# Altium PCB 4GModule-MiniPCI-E_PCB.PcbDoc
Units mil, origin at the board's own origin, x right, y up, seen from the top; angles counter-clockwise.
Board outline not stored, 4 copper layers (Top Layer, Internal Plane 1, Mid-Layer 1, Bottom Layer), stack 18.2 mil thick; 25 components, 0 nets, 124 pads, 0 vias.
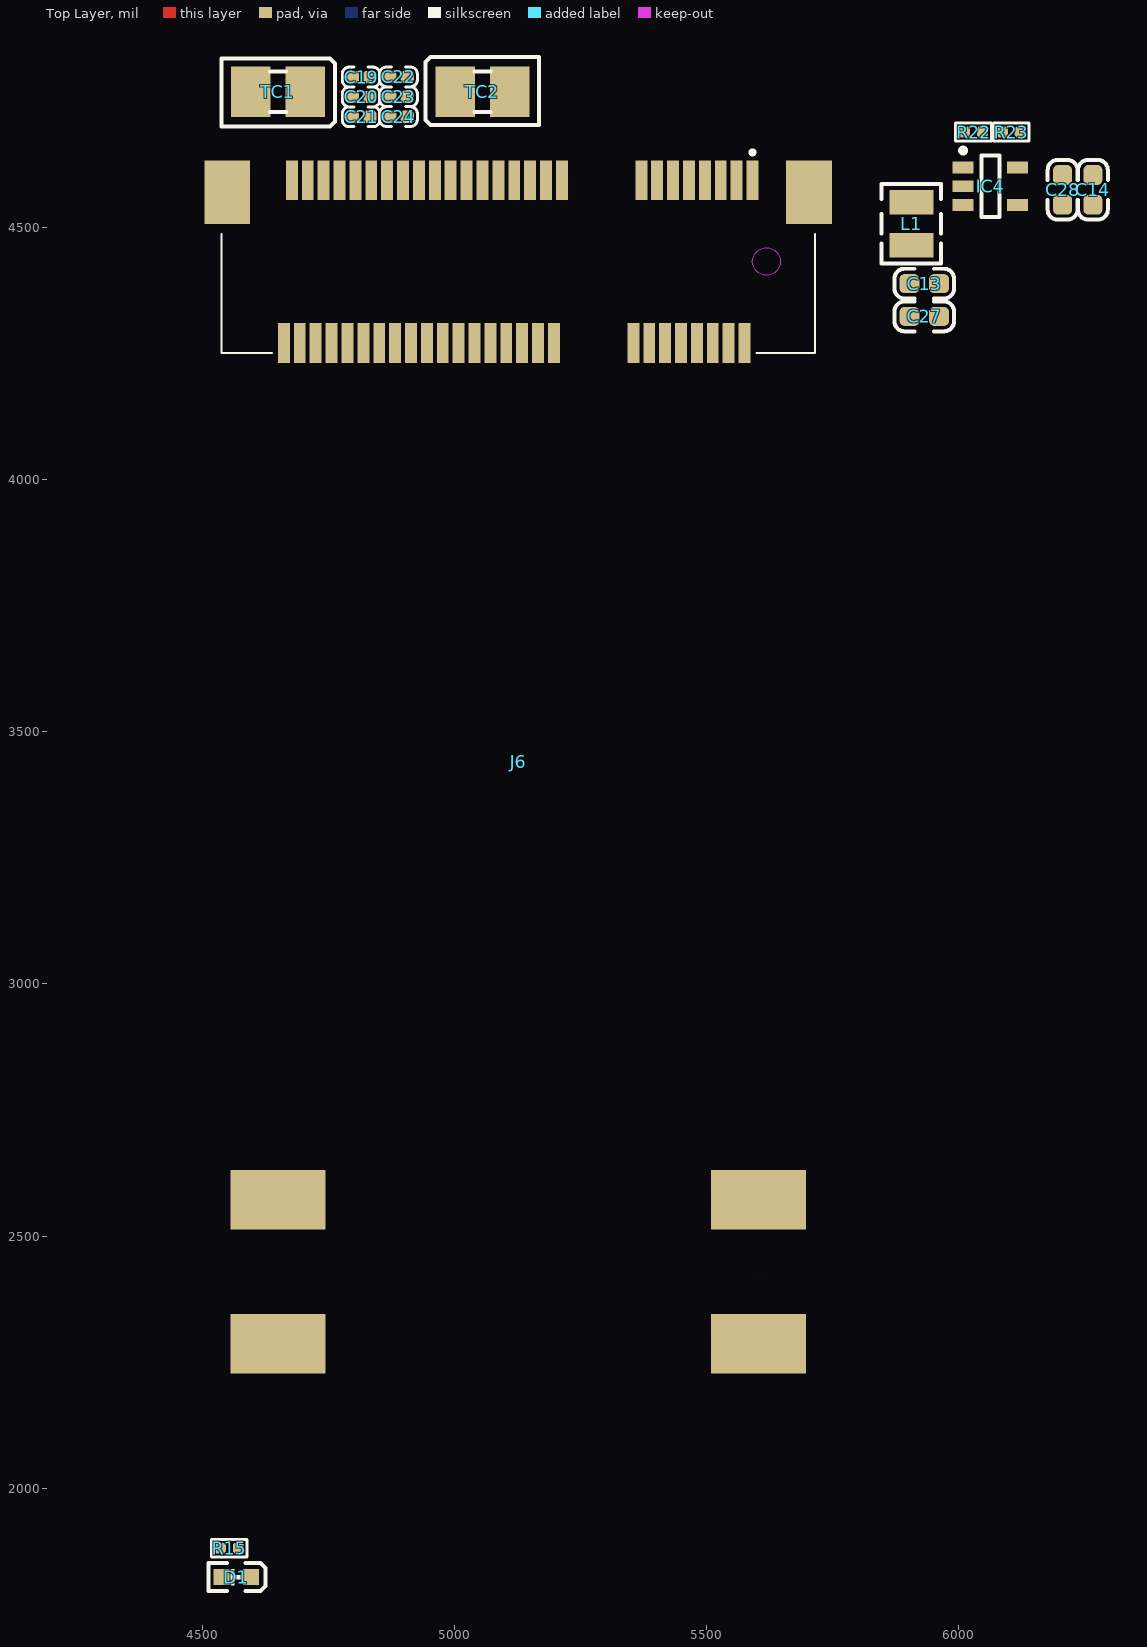
[diagram p0: Top Layer view]
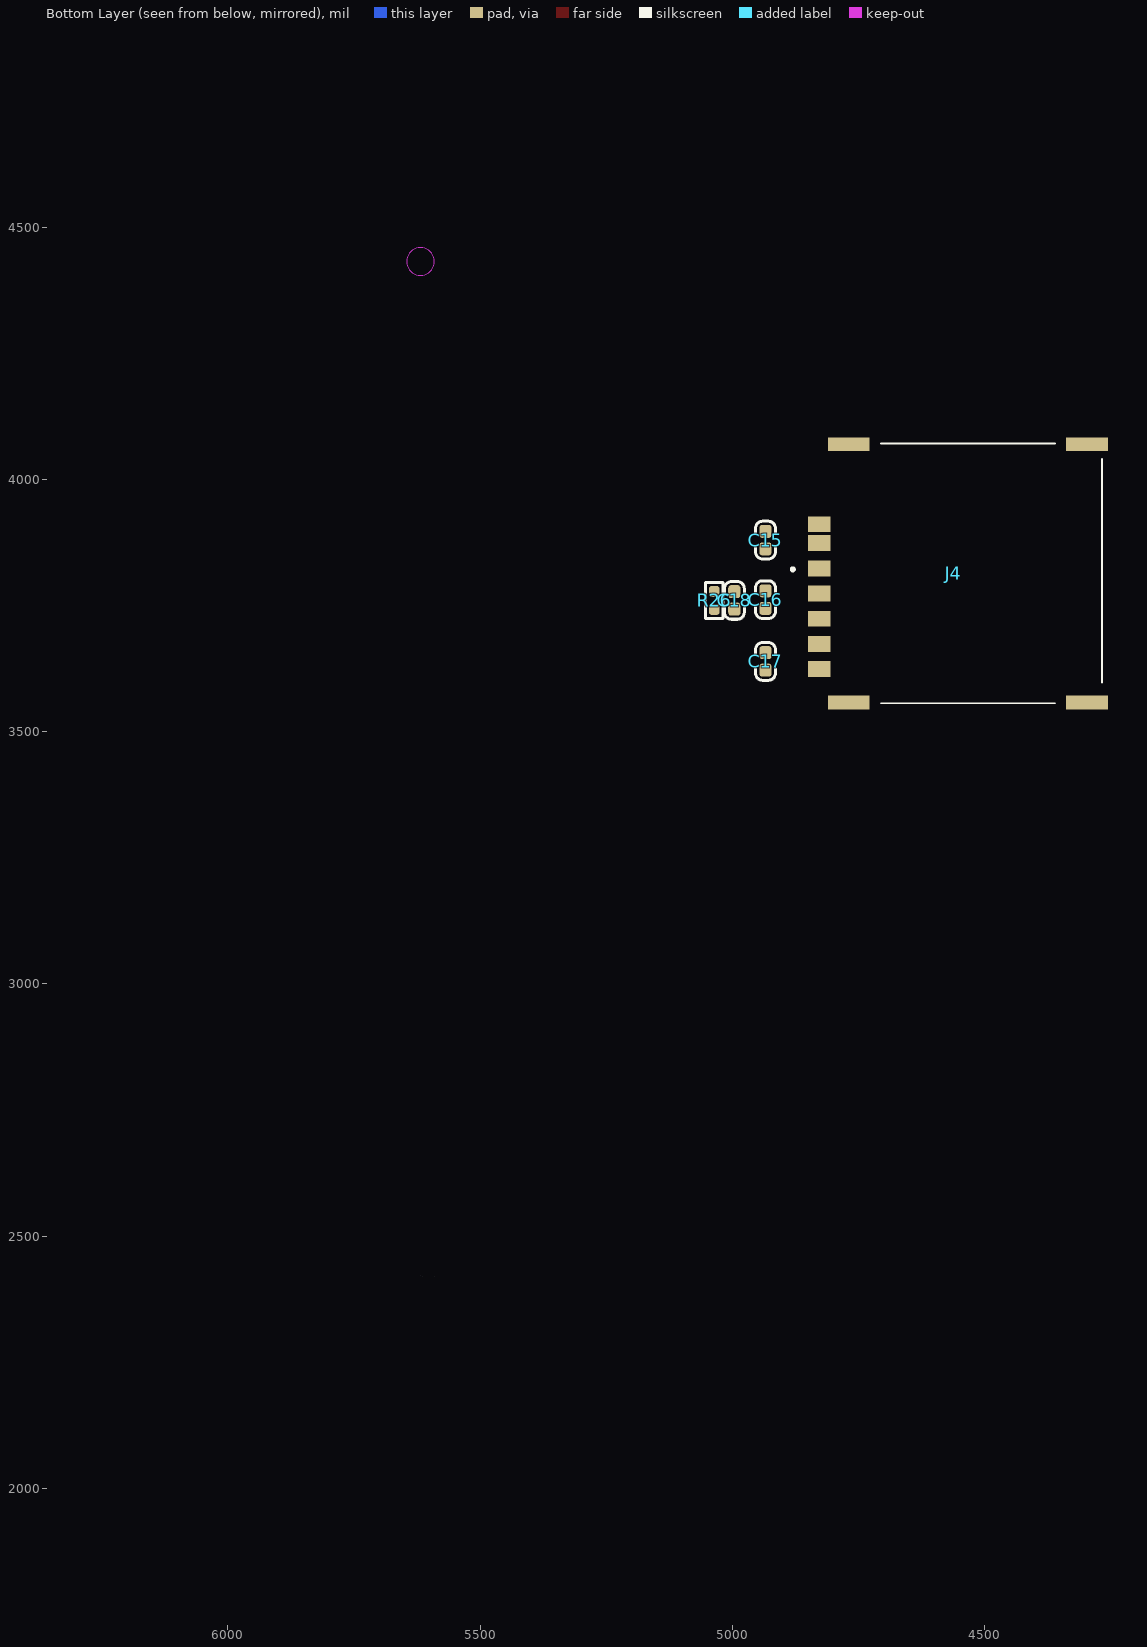
[diagram p1: Bottom Layer view, seen from below]
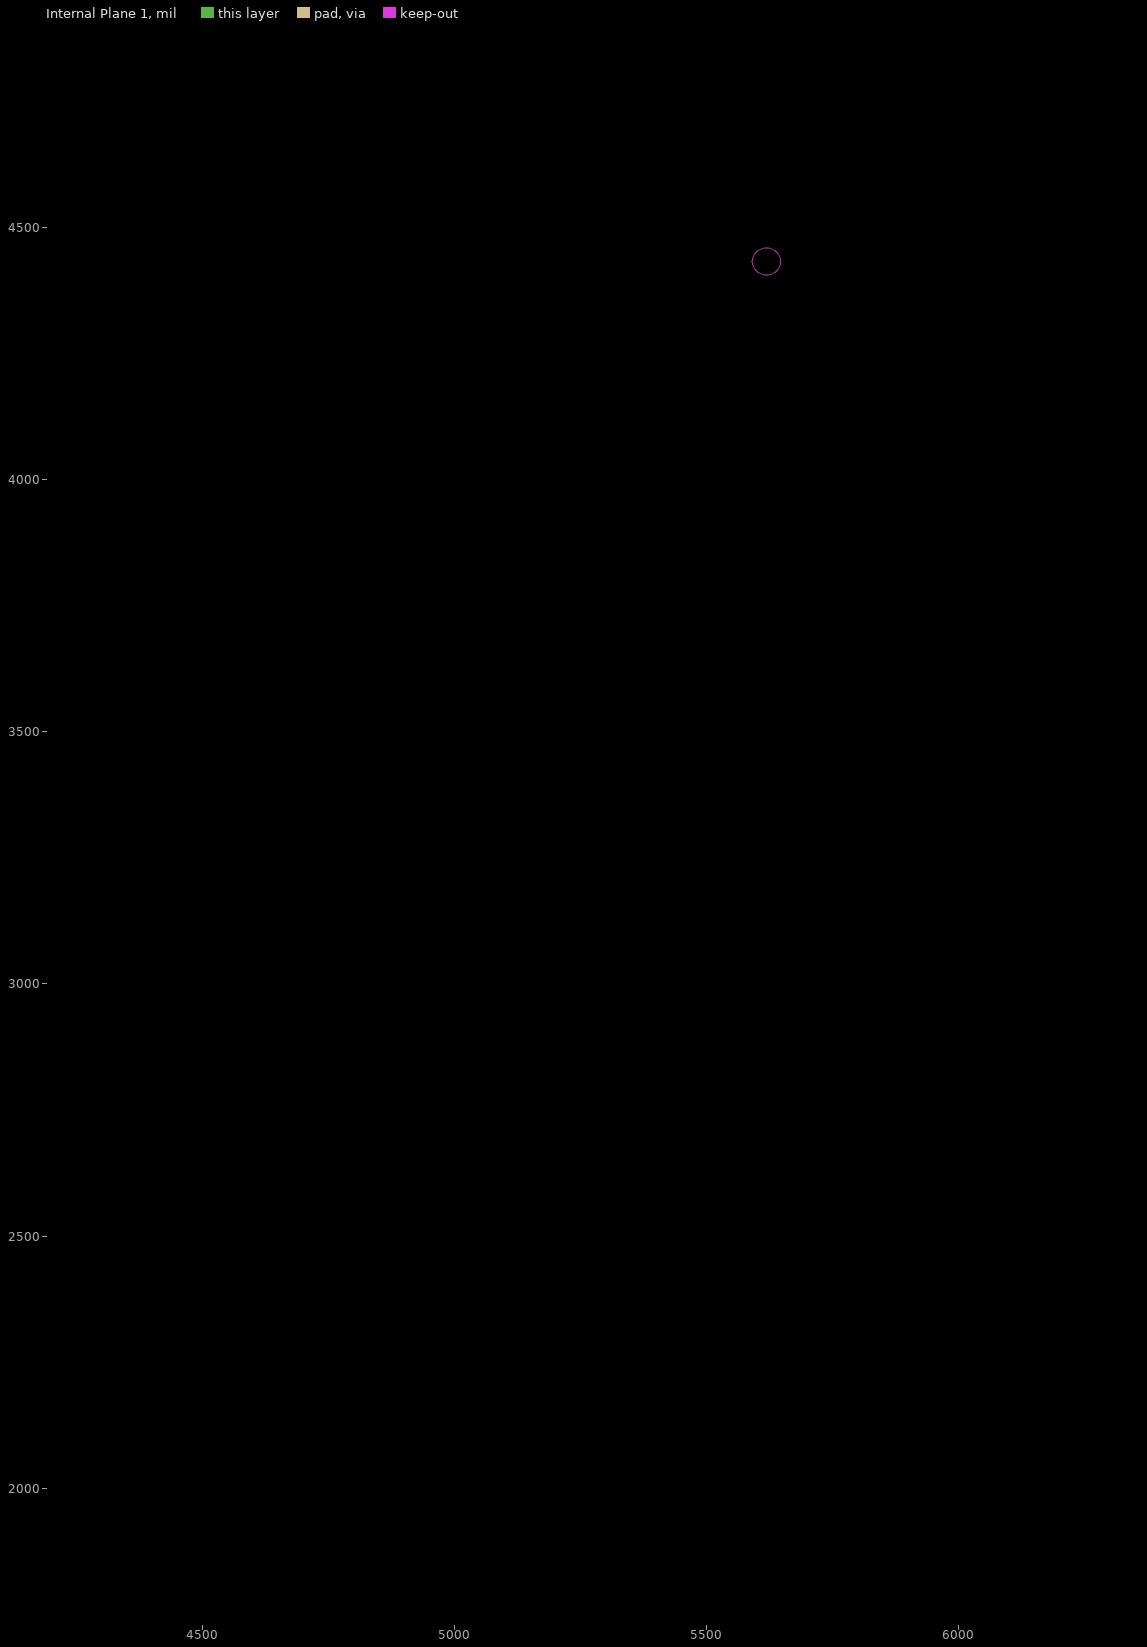
[diagram p2: Internal Plane 1, clearances drawn from the general rule]

## Layer stack, top to bottom
Top Solder: solder mask 0.4, Solder Resist, Dk 3.5
Top Layer: signal copper 1.4
Dielectric 1: dielectric 12.6, FR-4, Dk 4.8
Internal Plane 1: plane copper 1.4
Mid-Layer 1: signal copper 1.4
Bottom Layer: signal copper 1.4
Bottom Solder: solder mask 0.4, Solder Resist, Dk 3.5

## Components (designator, comment, footprint, x,y, rotation, side; value= is the part's Value field where it differs from the comment)
C13 "22uF" C_0603 5931.1,4388.5 r180 top
C14 "22uF" C_0603 6265.49,4574.46 r270 top
C15 "100nF" C_0402 4934.07,3880 r270 bottom
C16 "33pF" C_0402 4934.07,3761.89 r270 bottom
C17 "33pF" C_0402 4934.07,3639.45 r90 bottom
C18 "33pF" C_0402 4995.67,3760.43 r270 bottom
C19 "100nF" C_0402 4814.57,4798.03 r180 top
C20 "33pF" C_0402 4814.57,4758.66 r180 top
C21 "10pF" C_0402 4814.57,4719.29 r180 top
C22 "100nF" C_0402 4888.58,4798.43 r0 top
C23 "33pF" C_0402 4888.58,4759.05 r0 top
C24 "10pF" C_0402 4888.58,4719.68 r0 top
C27 "22uF" C_0603 5931.1,4323.5 r180 top
C28 "22uF" C_0603 6205.32,4574.46 r270 top
D1 "Blue" LED-0603-B 4566.93,1823.97 r0 top
IC4 "BL8028" SOT23-5 6062.16,4581.55 r0 top
J4 "SMN-303" SimCard_SMN-303 4547.24,3814.17 r90 bottom locked
J6 "mini-PCI-E" CARDEDGE_MINI-PCI-E-4H 5618.11,4432.28 r180 top locked
L1 "2.2uH/2A" L_1008 5905.51,4507.09 r270 top
R15 "10kΩ" R_0402 4553.15,1881.1 r0 top
R22 "100kΩ" R_0402 6028.79,4689.15 r180 top
R23 "22kΩ" R_0402 6103.6,4689.15 r180 top
R26 "15kΩ" R_0402 5035.67,3760.43 r90 bottom
TC1 "100uF/6.3V" TAJ-B/3528 4649.61,4768.7 r180 top
TC2 "100uF/6.3V" TAJ-B/3528 5055.12,4768.7 r0 top

## Footprints (in the part's own frame and the unit in brackets; to place one, negate y for a bottom-side part, rotate by r counter-clockwise, add the part's x,y. Pads: shape width x height; smd on the part's side, far side on the other; paste and mask are expansions set on the pad)
C_0402 [mm] "Chip Capacitor, 2-Leads, Body 1.00x0.50mm, IPC Medium Density"
  rrect50% 0.66x0.62 smd: 1(-0.44,0) 2(0.44,0)
  silkscreen extent -0.95,-0.5 0.95,0.5, body extent -0.52,-0.27 0.53,0.28, height 0.55
C_0603 [mm] "Chip Capacitor, 2-Leads, Body 1.60x0.80mm, IPC Medium Density"
  rrect50% 1x0.95 smd: 1(-0.75,0) 2(0.75,0)
  silkscreen extent -1.5,-0.75 1.5,0.75, body extent -0.8,-0.4 0.8,0.4, height 0.87
CARDEDGE_MINI-PCI-E-4H [mm] "MINI PCI-e 52P贴片插座"
  rect 0.6x2 smd: 1(0.7,-4.1) 2(1.1,4.1) 3(1.5,-4.1) 4(1.9,4.1) 5(2.3,-4.1) 6(2.7,4.1) 7(3.1,-4.1) 8(3.5,4.1) 9(3.9,-4.1) 10(4.3,4.1) 11(4.7,-4.1) 12(5.1,4.1) 13(5.5,-4.1) 14(5.9,4.1) 15(6.3,-4.1) 16(6.7,4.1) 17(10.3,-4.1) 18(10.7,4.1) 19(11.1,-4.1) 20(11.5,4.1) 21(11.9,-4.1) 22(12.3,4.1) 23(12.7,-4.1) 24(13.1,4.1) 25(13.5,-4.1) 26(13.9,4.1) 27(14.3,-4.1) 28(14.7,4.1) 29(15.1,-4.1) 30(15.5,4.1) 31(15.9,-4.1) 32(16.3,4.1) 33(16.7,-4.1) 34(17.1,4.1) 35(17.5,-4.1) 36(17.9,4.1) 37(18.3,-4.1) 38(18.7,4.1) 39(19.1,-4.1) 40(19.5,4.1) 41(19.9,-4.1) 42(20.3,4.1) 43(20.7,-4.1) 44(21.1,4.1) 45(21.5,-4.1) 46(21.9,4.1) 47(22.3,-4.1) 48(22.7,4.1) 49(23.1,-4.1) 50(23.5,4.1) 51(23.9,-4.1) 52(24.3,4.1)
  rect 2.3x3.2 smd: 53(-2.15,-3.5) 54(27.15,-3.5)
  rect 4.8x3 smd: 53(0.4,54.5) 53(0.4,47.25) 53(24.6,47.25) 53(24.6,54.5)
  round 1.524 hole 1.6: 55(0,0) 55(0.4,50.4)
  round 1 hole 1.1: 56(24.6,50.4) 56(25,0)
  Keep-Out Layer board cut-out: 0,-0.7 -0.268,-0.647 -0.495,-0.495 -0.647,-0.268 -0.7,0 -0.7,0 -0.647,0.268 -0.495,0.495 -0.268,0.647 0,0.7 0,0.7 0.268,0.647 0.495,0.495 0.647,0.268 0.7,0 0.7,0 0.647,-0.268 0.495,-0.495 0.268,-0.647 0,-0.7
  silkscreen extent -2.45,-5.6 27.45,4.6, body extent -2.5,-4.56 27.5,55.5, height 5.05
L_1008 [mm] "Chip Inductor, 2-Leads, Body 2.50x2.00mm, IPC Medium Density"
  rect 1.23x2.22 smd: 1(-1.085,0) 2(1.085,0)
  silkscreen extent -2,-1.5 2,1.5, body extent -1.35,-1.1 1.35,1.1, height 1.2
LED-0603-B [mm] "Chip Diode, 2-Leads, Body 1.55x0.80mm, IPC Medium Density"
  rect 0.8x0.8 smd: A(-0.75,0) K(0.75,0)
  silkscreen extent -1.4,-0.7 1.48,0.7, body extent -0.8,-0.4 0.8,0.4, height 0.61
R_0402 [mm] "Chip Resistor, 2-Leads, Body 1.00x0.50mm, IPC Medium Density"
  rrect50% 0.55x0.55 smd: 1(-0.45,0) 2(0.45,0)
  silkscreen extent -0.9,-0.45 0.9,0.45, body extent -0.5,-0.27 0.5,0.28, height 0.4
SimCard_SMN-303 [mm] "Nano SIM 自弹"
  rect 0.8x1.14 smd: C1(0.25,7.115) C2(-2.29,7.115) C3(-4.83,7.115) C5(1.52,7.115) C6(-1.02,7.115) C7(-3.56,7.115) CD1(2.47,7.115)
  round 0.375 hole 0.75 unplated: MH1(3.5,-5.115) MH2(-5,-5.115)
  rect 0.7x2.1 smd: MP1(-6.5,-6.365) MP2(-6.5,5.635) MP3(6.5,5.635) MP4(6.5,-6.365)
  silkscreen extent -6.55,-7.12 6.55,8.5, body extent -6.54,-8.26 6.55,7.4, height 1.34
SOT23-5 [mm] "SOT23, 5-Leads, Body 2.90x2.80mm, Pitch 0.95mm, IPC Medium Density"
  rect 1.05x0.6 smd: 1(-1.375,0.95) 2(-1.375,0) 3(-1.375,-0.95) 4(1.375,-0.95) 5(1.375,0.95)
  silkscreen extent -1.5,-1.55 0.45,1.92, body extent -1.4,-1.52 1.4,1.48, height 1.15
TAJ-B/3528 [mm]
  rect 2x2.54 smd: 1(-1.374,0) 2(1.374,0)
  silkscreen extent -2.87,-1.68 2.85,1.75, body extent -1.72,-1.42 1.78,1.38, height 1.9

## Part data
C13 C14 C15 C16 C17 C18 C19 C20 C21 C22 C23 C24 C27 C28: library part Cap_Chip, "贴片电容"
D1: library part LED_Chip, "贴片LED"
IC4: "DC-DC 芯片"
J4: library part SimCard_Nano, "NANO SIM卡座", Manufacturer_Part_Number=SMN-303
J6: library part CardEdge_MiniPCI-E, "EC25 mini-PCI-E 座子"
L1: library part Ind_Chip, "小功率电感", Manufacturer_Name=chilisin(奇力新), Manufacturer_Part_Number=BDCD002520122R2MS1
R15 R22 R23 R26: library part Res_Chip, "贴片电阻"
TC1 TC2: library part Cap_TAN, "钽电容"

## Nets (pads, with @x,y where several pads share a name; then routed paths per layer and width w, separated by ;. In a path a pad name is that pad's centre, name@x,y a point inside that pad or via, vN(x,y) a via of type N, cw(c..) or ccw(c..) an arc to the next point about the centre after c; other vN are vias at no path point)
pads on no net: C13.1 C13.2 C14.1 C14.2 C15.1 C15.2 C16.1 C16.2 C17.1 C17.2 C18.1 C18.2 C19.1 C19.2 C20.1 C20.2 C21.1 C21.2 C22.1 C22.2 C23.1 C23.2 C24.1 C24.2 C27.1 C27.2 C28.1 C28.2 D1.A D1.K IC4.1 IC4.2 IC4.3 IC4.4 IC4.5 J4.C1 J4.C2 J4.C3 J4.C5 J4.C6 J4.C7 J4.CD1 J4.MH1 J4.MH2 J4.MP1 J4.MP2 J4.MP3 J4.MP4 J6.1 J6.2 J6.3 J6.4 J6.5 J6.6 J6.7 J6.8 J6.9 J6.10 J6.11 J6.12 J6.13 J6.14 J6.15 J6.16 J6.17 J6.18 J6.19 J6.20 J6.21 J6.22 J6.23 J6.24 J6.25 J6.26 J6.27 J6.28 J6.29 J6.30 J6.31 J6.32 J6.33 J6.34 J6.35 J6.36 J6.37 J6.38 J6.39 J6.40 J6.41 J6.42 J6.43 J6.44 J6.45 J6.46 J6.47 J6.48 J6.49 J6.50 J6.51 J6.52 J6.53 J6.54 J6.55 J6.56 L1.1 L1.2 R15.1 R15.2 R22.1 R22.2 R23.1 R23.2 R26.1 R26.2 TC1.1 TC1.2 TC2.1 TC2.2